# Altium PCB CS301_YOURGROUPNUM.PcbDoc
Units mil, origin at the board's own origin, x right, y up, seen from the top; angles counter-clockwise.
Board outline 4560 x 5000 mil, 2 copper layers (Top Layer, Bottom Layer); 100 components, 58 nets, 323 pads, 8 vias.
Unrouted connection lines stored in the file: 100.
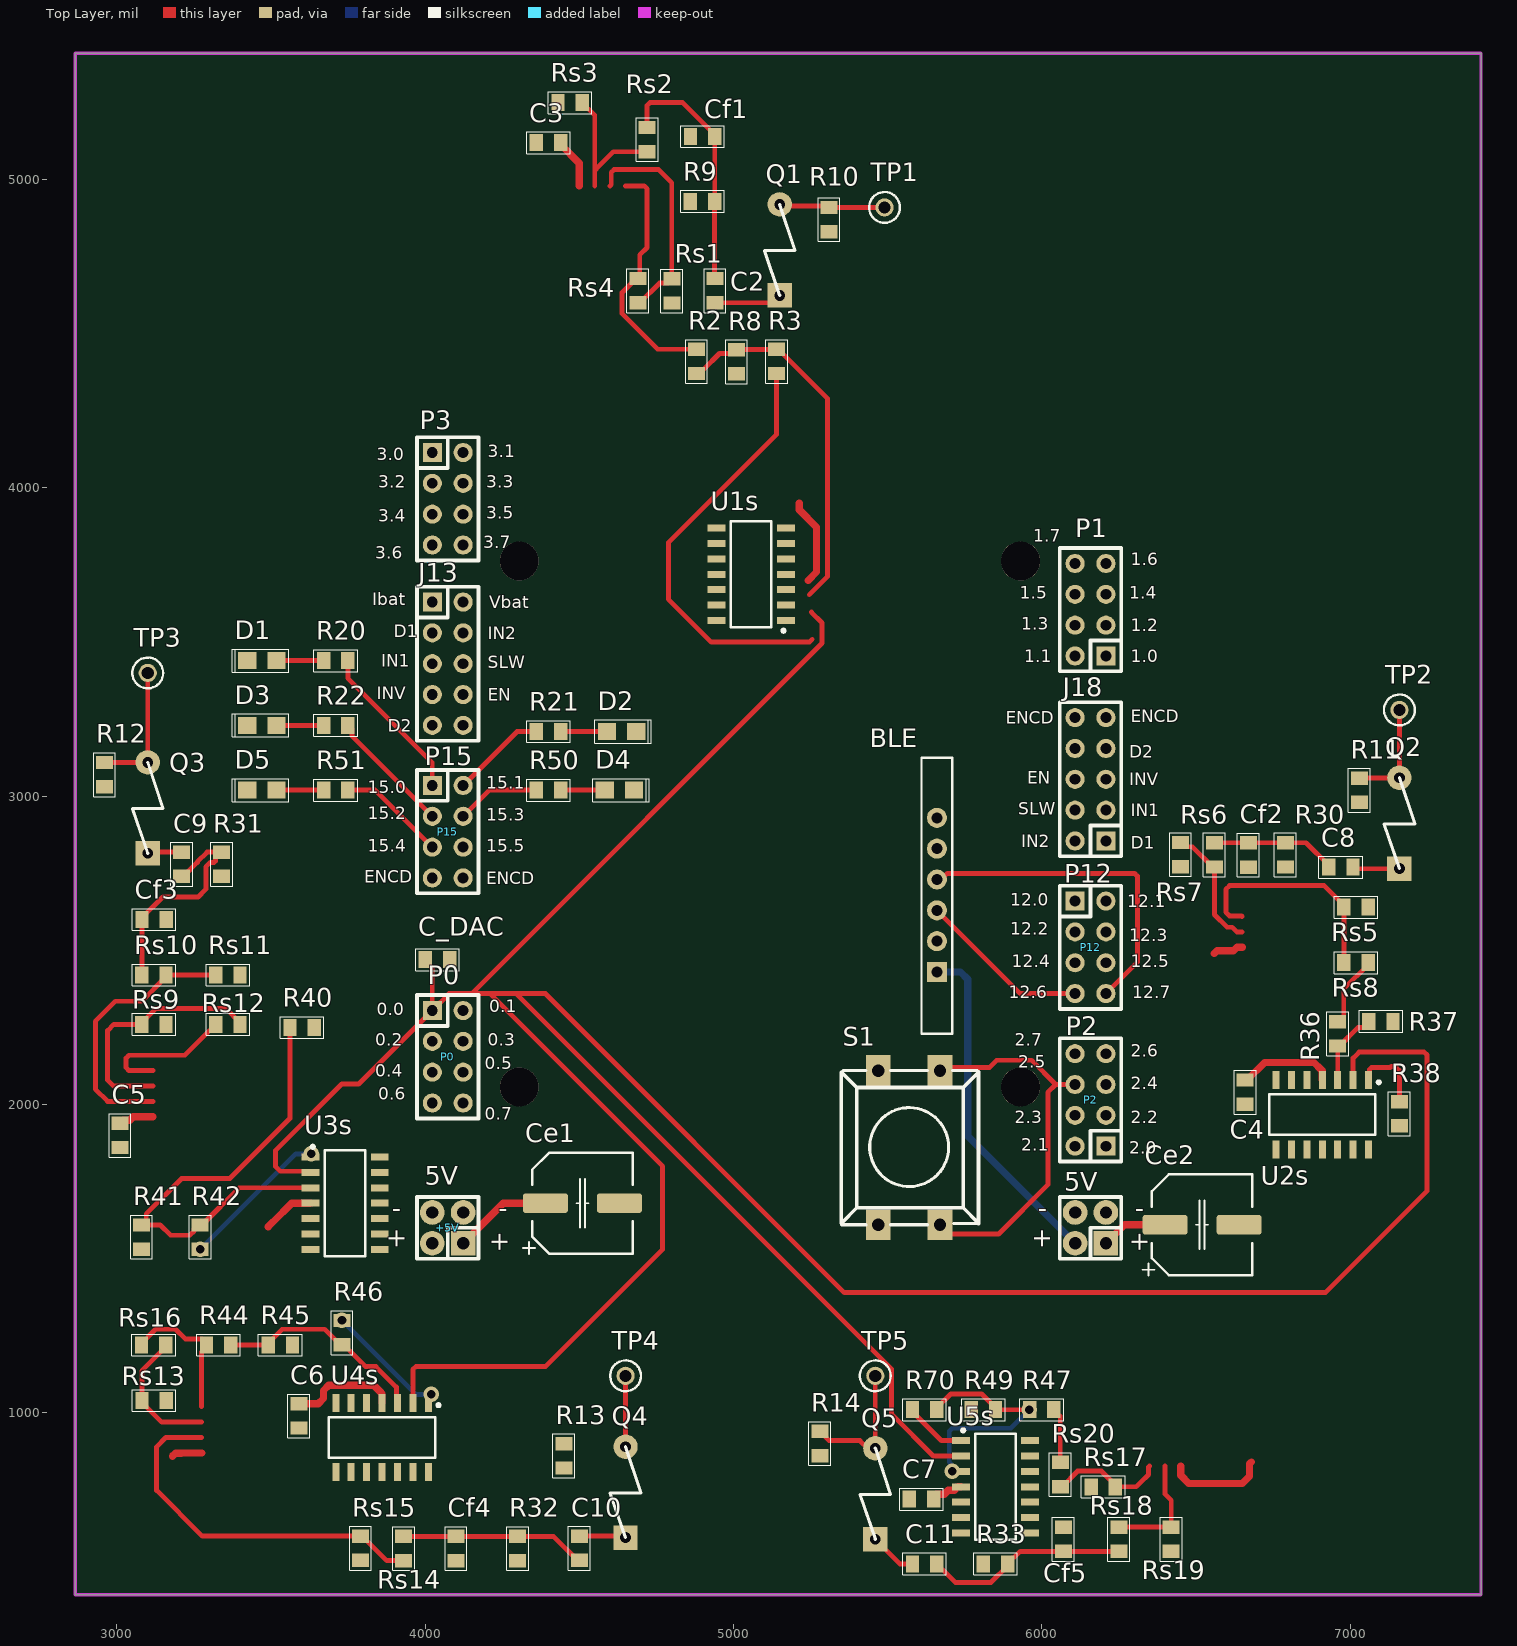
[diagram p0: Top Layer view]
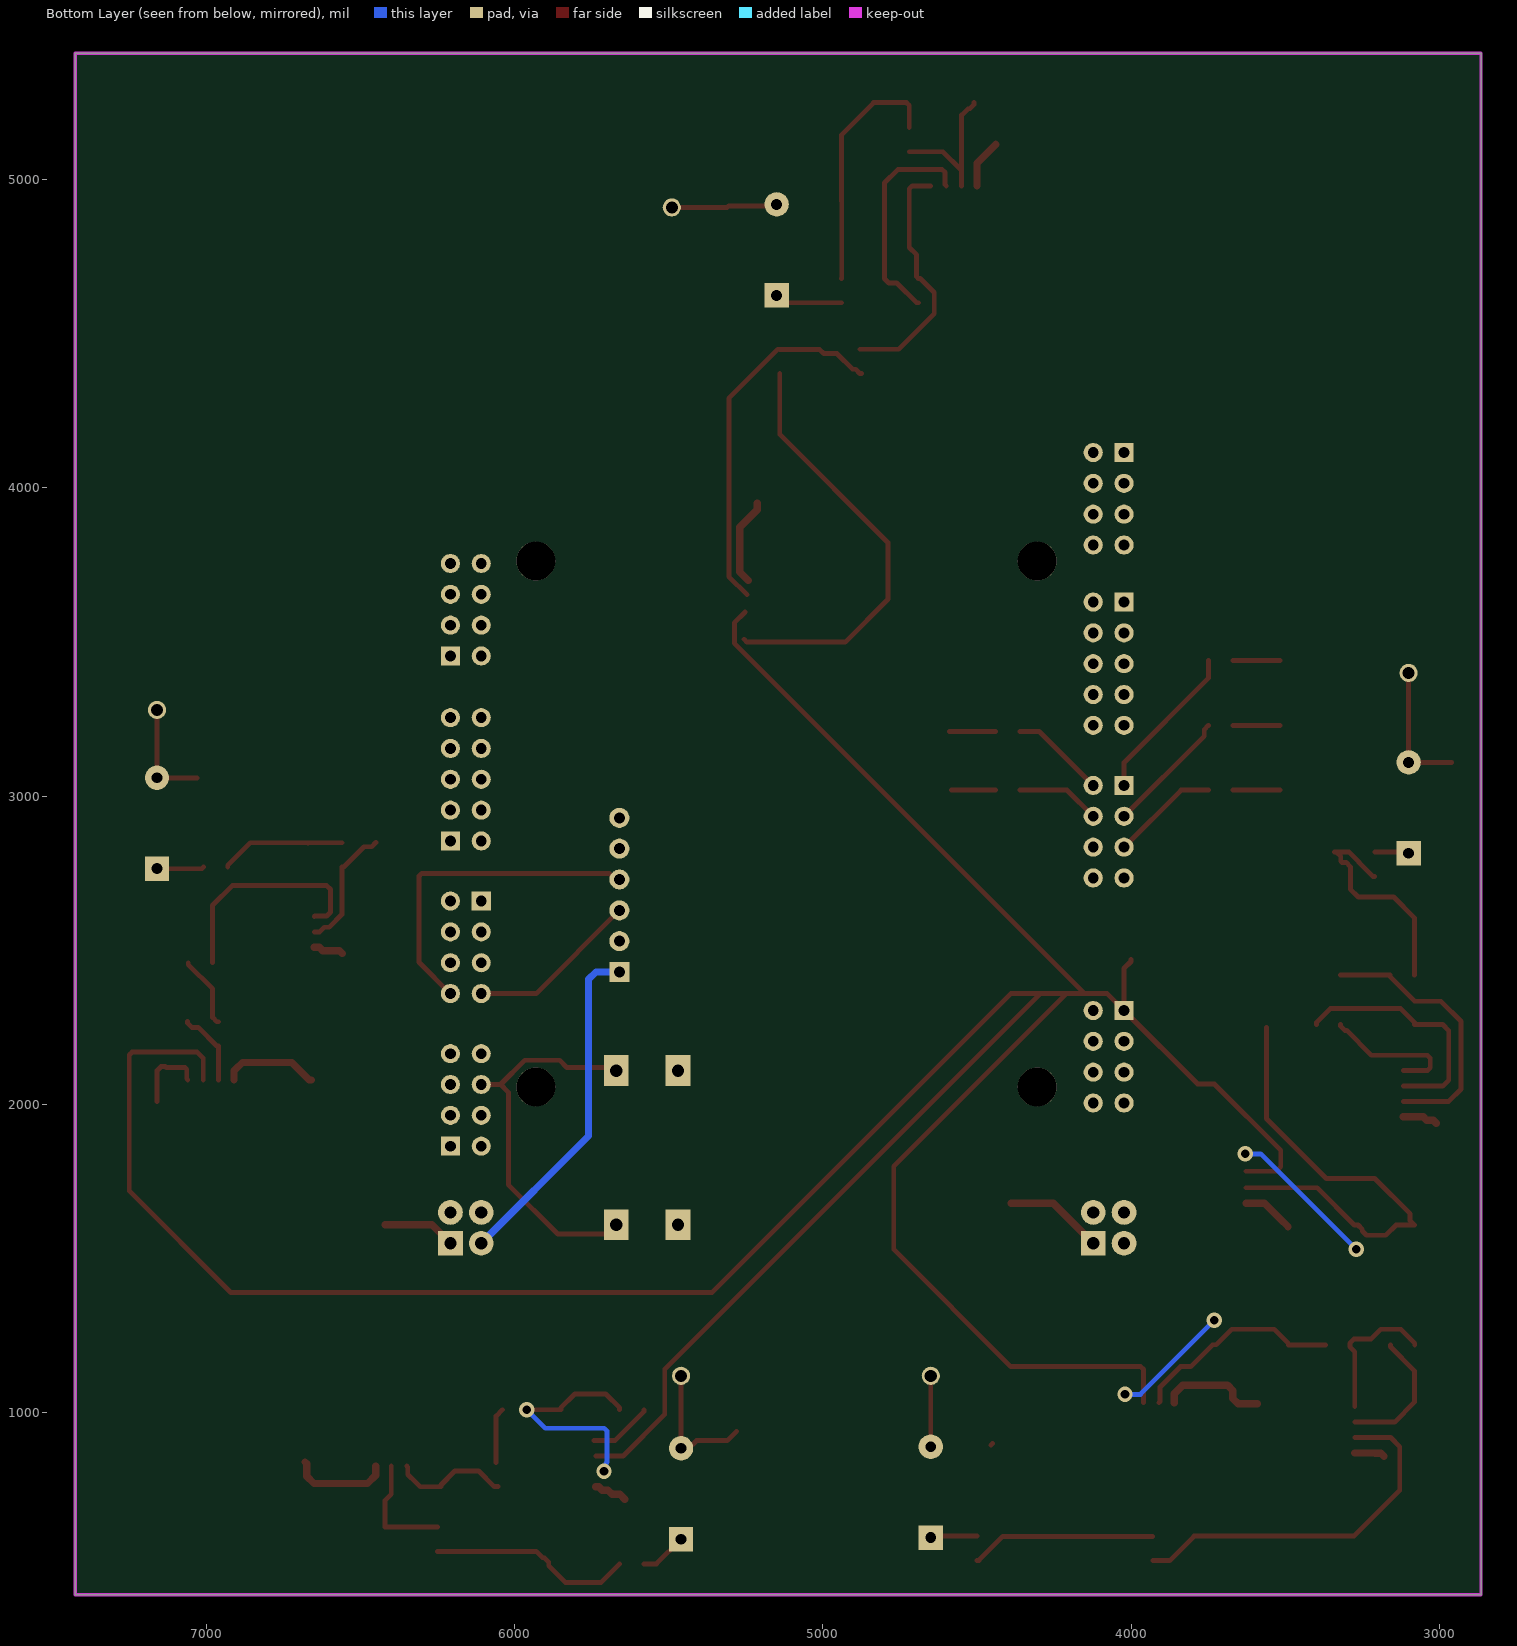
[diagram p1: Bottom Layer view, seen from below]

## Layer stack, top to bottom
Top Solder: solder mask 0.4, Solder Resist, Dk 3.5
Top Layer: signal copper 1.4
Dielectric 1: dielectric 12.6, FR-4, Dk 4.8
Bottom Layer: signal copper 1.4
Bottom Solder: solder mask 0.4, Solder Resist, Dk 3.5

## Board outline
2865,410 2865,5410 7425,5410 7425,410

## Design rules (kind name [scope] priority, off if disabled: settings)
Clearance [All] p1: gap=15.75 ignorepadtopadclearanceinfootprint=FALSE
Height [All] p1: minheight=0 maxheight=787.4 prefheight=500
HoleSize [All] p1: absolutevalues=TRUE maxlimit=393.7 minlimit=15.75 maxpercent=80.000 minpercent=20.000
PolygonConnect [All] p1: connectstyle=Relief reliefconductorwidth=23.62 reliefentries=4 polygonreliefangle="90 Angle" airgapwidth=15.75
RoutingVias [All] p1: holewidth=28 width=50 viastyle="Through Hole" minholewidth=28 minwidth=50 maxholewidth=28 maxwidth=50
SilkToSilkClearance [All] p1: silktosilkclearance=3.94
SilkToSolderMaskClearance [IsPad] p1: minsilkscreentomaskgap=3.94 clearancetoexposedcopper=TRUE
SolderMaskExpansion [All] p1: expansion=0 istentingtop=FALSE
SupplyNets "Schematic Supply Nets_9" [InNet('Vref_DAC')] p1: voltage=0.000
SupplyNets "Schematic Supply Nets_7" [InNet('Vb5')] p2: voltage=0.000
SupplyNets "Schematic Supply Nets_6" [InNet('Vb3')] p3: voltage=0.000
SupplyNets "Schematic Supply Nets_5" [InNet('Vb2')] p4: voltage=0.000
SupplyNets "Schematic Supply Nets_3" [InNet('Vb4')] p5: voltage=0.000
SupplyNets "Schematic Supply Nets_2" [InNet('Vb1')] p6: voltage=0.000
SupplyNets "Schematic Supply Nets_35" [InNet('Vout2')] p7: voltage=0.000
SupplyNets "Schematic Supply Nets_34" [InNet('Vout1')] p8: voltage=0.000
SupplyNets "Schematic Supply Nets_33" [InNet('Va5')] p9: voltage=0.000
SupplyNets "Schematic Supply Nets_32" [InNet('Vd5')] p10: voltage=0.000
SupplyNets "Schematic Supply Nets_30" [InNet('Vout3')] p11: voltage=0.000
SupplyNets "Schematic Supply Nets_28" [InNet('Vd2')] p12: voltage=0.000
SupplyNets "Schematic Supply Nets_27" [InNet('Vd1')] p13: voltage=0.000
SupplyNets "Schematic Supply Nets_25" [InNet('Va3')] p14: voltage=0.000
SupplyNets "Schematic Supply Nets_23" [InNet('Va2')] p15: voltage=0.000
SupplyNets "Schematic Supply Nets_22" [InNet('VRX')] p16: voltage=0.000
SupplyNets "Schematic Supply Nets_21" [InNet('Va1')] p17: voltage=0.000
SupplyNets "Schematic Supply Nets_20" [InNet('Vout5')] p18: voltage=0.000
SupplyNets "Schematic Supply Nets_19" [InNet('Va4')] p19: voltage=0.000
SupplyNets "Schematic Supply Nets_18" [InNet('Vd4')] p20: voltage=0.000
SupplyNets "Schematic Supply Nets_14" [InNet('VTX')] p21: voltage=0.000
SupplyNets "Schematic Supply Nets_13" [InNet('Vd3')] p22: voltage=0.000
SupplyNets "Schematic Supply Nets_10" [InNet('Vout4')] p23: voltage=0.000
SupplyNets "Schematic Supply Nets_8" [InNet('+5V')] p24: voltage=0.000
SupplyNets "Schematic Supply Nets_4" [InNet('GND')] p25: voltage=0.000
SupplyNets "Schematic Supply Nets_1" [InNet('5V')] p26: voltage=0.000
SupplyNets "Schematic Supply Nets" [InNet('+5')] p27: voltage=0.000
Width [All] p1: maxlimit=393.7 minlimit=15.75 preferedwidth=23.62
26 further rules are at their usual default settings.

## Components (designator, comment, footprint, x,y, rotation, side; value= is the part's Value field where it differs from the comment)
5V "5V" IDC4 6208.11,1550 r90 top locked
+5V "5V" IDC4 4123.11,1550 r90 top locked
BLE "BLE Module Header" HM10_HDR1X6 5660,2430 r90 top
C2 "0.27u" "0805 CAP" 4940,4640 r90 top
C3 "100nF" "0805 CAP" 4400,5120 r180 top
C4 "100nF" "0805 CAP" 6660,2040 r270 top
C5 "100nF" "0805 CAP" 3010,1900 r270 top
C6 "100nF" "0805 CAP" 3590,990 r270 top
C7 "100nF" "0805 CAP" 5610,720 r180 top
C8 "0.27u" "0805 CAP" 6970,2770 r180 top
C9 "0.27u" "0805 CAP" 3210,2779.37 r270 top
C10 "0.27u" "0805 CAP" 4500,560.63 r270 top
C11 "0.27u" "0805 CAP" 5620,510 r0 top
C_DAC "0.1uF" "0805 CAP" 4040,2470 r0 top
Ce1 "100uF" "CAP POL 8x5.4mm SMT" 4510.08,1680 r0 top
Ce2 "100uF" "CAP POL 8x5.4mm SMT" 6520,1610 r0 top
Cf1 "*" "0805 CAP" 4900,5140 r180 top
Cf2 "*" "0805 CAP" 6670,2809.37 r270 top
Cf3 "*" "0805 CAP" 3120.63,2600 r0 top
Cf4 "*" "0805 CAP" 4100,560 r270 top
Cf5 "*" "0805 CAP" 6070,590 r90 top
D1 "LTST-C170KGKT" "0805 LED" 3470,3440 r180 top
D2 "LTST-C170KGKT" "0805 LED" 4637.24,3210 r0 top
D3 "LTST-C170KGKT" "0805 LED" 3470,3230 r180 top
D4 "LTST-C170KGKT" "0805 LED" 4630,3020 r0 top
D5 "LTST-C170KGKT" "0805 LED" 3470,3020 r180 top
J13 "CON10" IDC10 4023.11,3630 r270 top locked
J18 "CON10" IDC10 6208.11,2855 r90 top locked
P0 "P0" idc8 4023.11,2305 r270 top locked
P1 "P1" idc8 6208.11,3455 r90 top locked
P2 "P2" idc8 6208.11,1865 r90 top locked
P3 "P3" idc8 4023.11,4115 r270 top locked
P12 "P12" idc8 6108.11,2660 r270 top locked
P15 "P15" IDC8 4023.11,3035 r270 top locked
Q1 "VEMT3700" VEMT3700 5300,4525 r90 top
Q2 "VEMT3700" VEMT3700 7310,2665 r90 top
Q3 "VEMT3700" VEMT3700 3250,2715 r90 top
Q4 "VEMT3700" VEMT3700 4800,495 r90 top
Q5 "VEMT3700" VEMT3700 5610,490 r90 top
R2 "2k" "0805 RES" 4880,4410.63 r270 top
R3 "50k" "0805 RES" 5140,4410.63 r90 top
R8 "40k" "0805 RES" 5010,4409.37 r270 top
R9 "100k" "0805 RES" 4899.37,4930 r0 top
R10 "33k" "0805 RES" 5310,4870.63 r90 top
R11 "33k" "0805 RES" 7030,3019.37 r90 top
R12 "33k" "0805 RES" 2960,3070 r90 top
R13 "33k" "0805 RES" 4450,860.63 r90 top
R14 "33k" "0805 RES" 5280,900.63 r90 top
R20 "68" "0805 RES" 3710,3440 r180 top
R21 "68" "0805 RES" 4400,3210 r0 top
R22 "68" "0805 RES" 3710,3230 r180 top
R30 "100k" "0805 RES" 6790,2810 r90 top
R31 "100k" "0805 RES" 3340,2779.37 r90 top
R32 "100k" "0805 RES" 4300,560 r90 top
R33 "100k" "0805 RES" 5850,510 r0 top
R36 "2k" "0805 RES" 6960,2229.37 r270 top
R37 "40k" "0805 RES" 7100,2270 r0 top
R38 "50k" "0805 RES" 7160,1970 r270 top
R40 "2k" "0805 RES" 3600.63,2250 r180 top
R41 "40k" "0805 RES" 3080,1570 r270 top
R42 "50k" "0805 RES" 3270,1570 r90 top
R44 "2k" "0805 RES" 3330,1220 r0 top
R45 "40k" "0805 RES" 3530,1220 r0 top
R46 "50k" "0805 RES" 3730,1260 r270 top
R47 "2k" "0805 RES" 6000,1010 r180 top
R49 "40k" "0805 RES" 5810.63,1010 r180 top
R50 "68" "0805 RES" 4400,3020 r0 top
R51 "68" "0805 RES" 3710,3020 r180 top
R70 "50k" "0805 RES" 5620,1010 r0 top
Rs1 "10k" "0805 RES" 4800,4639.37 r90 top
Rs2 "10k" "0805 RES" 4720,5130 r270 top
Rs3 "36k" "0805 RES" 4470,5250 r0 top
Rs4 "36k" "0805 RES" 4690,4640 r90 top
Rs5 "10k" "0805 RES" 7019.37,2640 r180 top
Rs6 "10k" "0805 RES" 6560,2810 r270 top
Rs7 "36k" "0805 RES" 6450,2810.63 r90 top
Rs8 "36k" "0805 RES" 7019.37,2460 r0 top
Rs9 "10k" "0805 RES" 3120,2260 r180 top
Rs10 "10k" "0805 RES" 3120,2420 r0 top
Rs11 "36k" "0805 RES" 3360,2420 r180 top
Rs12 "36k" "0805 RES" 3360,2260 r180 top
Rs13 "10k" "0805 RES" 3120.63,1040 r180 top
Rs14 "10k" "0805 RES" 3930,560 r270 top
Rs15 "36k" "0805 RES" 3790,560.63 r90 top
Rs16 "36k" "0805 RES" 3119.37,1220 r180 top
Rs17 "10k" "0805 RES" 6199.37,760 r0 top
Rs18 "10k" "0805 RES" 6250,590 r90 top
Rs19 "36k" "0805 RES" 6420,590 r90 top
Rs20 "36k" "0805 RES" 6060,800 r90 top
S1 "SW-PB" SW-PB 5450,1710 r90 top
TP1 "5003" TP_TH 5490,4910 r0 top
TP2 "5003" TP_TH 7160,3280 r0 top
TP3 "5003" TP_TH 3100,3400 r0 top
TP4 "5003" TP_TH 4650,1120 r0 top
TP5 "5003" TP_TH 5460,1120 r0 top
U1s "LM324DR2G" SOIC-14 5057.4,3720 r180 top
U2s "LM324DR2G" SOIC-14 6910,1967.4 r270 top
U3s "LM324DR2G" SOIC-14 3740,1680 r0 top
U4s "LM324DR2G" SOIC-14 3860,920 r270 top
U5s "LM324DR2G" SOIC-14 5850,760 r0 top

## Footprints (in the part's own frame and the unit in brackets; to place one, negate y for a bottom-side part, rotate by r counter-clockwise, add the part's x,y. Pads: shape width x height; smd on the part's side, far side on the other; paste and mask are expansions set on the pad)
"0805 CAP" [mm] "http://www.digikey.co.nz/Web%20Export/Supplier%20Content/Vishay_8026/PDF/VishayBeyschlag_SolderPad.pdf?redirected=1 with dimension G modified by +0.25mm"
  rect 1.1x1.4 smd: 1(-1,0) 2(1,0)
  silkscreen extent -1.8,-0.9 1.8,0.9, body extent -1.04,-0.66 1.04,0.66, height 0.61
"0805 LED" [mm] "RED AS AlGaAs SMD LED, Body; 2mm x 1.25 mm (LxW)"
  rect 1.5x1.4 smd: 1(-1.2,0) 2(1.2,0)
  silkscreen extent -2.2,-0.95 2.45,0.95, body extent -1,-0.63 1,0.63, height 1.1
"0805 RES" [mm] "http://www.digikey.co.nz/Web%20Export/Supplier%20Content/Vishay_8026/PDF/VishayBeyschlag_SolderPad.pdf?redirected=1 with dimension G modified by +0.25mm"
  rect 1.1x1.4 smd: 1(-1,0) 2(1,0)
  silkscreen extent -1.8,-0.9 1.8,0.9, body extent -1.04,-0.66 1.04,0.66, height 0.61
"CAP POL 8x5.4mm SMT" [mm]
  round 0.508 on Mech15: 0(0,0)
  rrect25% 3.7x1.6 smd: 1(-3.05,0) 2(3.05,0)
  silkscreen extent -4.9,-4.2 4.15,4.15, body extent -4.5,-4.15 4.5,4.15, height 5.4
HM10_HDR1X6 [mil] "Connector; Header; 6 Position"
  rect 65x65 hole 35.43: 1(0,0)
  round 65 hole 35.43: 2(100,0) 3(200,0) 4(300,0) 5(400,0) 6(500,0)
  silkscreen extent -200,-50 695,50, body extent -142,-39 571,228, height 1843
IDC4 [mil]
  rect 80x80 hole 40: 1(0,0)
  round 80 hole 40: 2(0,100) 3(100,0) 4(100,100)
  silkscreen extent -50,-50 150,150
idc8 [mil]
  rect 62x62 hole 35: 1(0,0)
  round 62 hole 35: 2(0,100) 3(100,0) 4(100,100) 5(200,0) 6(200,100) 7(300,0) 8(300,100)
  silkscreen extent -50,-50 350,150
IDC8 [mil]
  rect 62x62 hole 35: 1(0,0)
  round 62 hole 35: 2(0,100) 3(100,0) 4(100,100) 5(200,0) 6(200,100) 7(300,0) 8(300,100)
  silkscreen extent -50,-50 350,150
IDC10 [mil]
  rect 62x62 hole 35: 1(0,0)
  round 62 hole 35: 2(0,100) 3(100,0) 4(100,100) 5(200,0) 6(200,100) 7(300,0) 8(300,100) 9(400,0) 10(400,100)
  silkscreen extent -50,-50 450,150
SOIC-14 [mm] "SOIC, 14-Leads, Body 8.75x4mm, Pitch 1.27mm"
  rect 1.48x0.58 smd: 1(-2.86,3.81) 2(-2.86,2.54) 3(-2.86,1.27) 4(-2.86,0) 5(-2.86,-1.27) 6(-2.86,-2.54) 7(-2.86,-3.81) 8(2.86,-3.81) 9(2.86,-2.54) 10(2.86,-1.27) 11(2.86,0) 12(2.86,1.27) 13(2.86,2.54) 14(2.86,3.81)
  silkscreen extent -2.79,-4.38 1.67,4.77, body extent -3.1,-4.38 3.1,4.37, height 1.75
SW-PB [mil]
  rect 100x80 hole 40: 1(-100,-20) 1(400,-20) 2(-100,-220) 2(400,-220)
  silkscreen extent -100,-345 400,100
TP_TH [mm] "Test Point, Through Hole, Dia 2.54mm"
  round 1.5 hole 1: 1(0,0)
  silkscreen extent -1.27,-1.27 1.27,1.27, body extent -1.27,-1.27 1.27,1.27, height 4.57
VEMT3700 [mm]
  rect 2x2 hole 0.9: 1(2.54,3.81)
  round 2 hole 0.9: 2(10.033,3.81)
  silkscreen extent 2.54,2.54 10.03,5.08

## Part data
5V +5V: library part CON4, "Connector"
BLE: library part BLEModule_TH, "2.54mm pitch 6-pin header for BLE module", LatestRevisionDate=17-Jul-2002, LatestRevisionNote="Re-released for DXP Platform.", Publisher="Altium Limited"
C2 C3 C4 C5 C6 C7 C8 C9 C10 C11 C_DAC Cf1 Cf2 Cf3 Cf4 Cf5: library part CerCap_SMT_0805, "SMT ceramic capacitor 0805 size"
Ce1 Ce2: library part ElecCap_SMT_8D0, "CAP ALUM 22UF 20% 50V SMD (Model: UWX1H220MCL1GB)", Capacitance 1="22 µF", ESR (Equivalent Series Resistance)=-, Lifetime @ Temp.="2000 Hrs @ 85°C", Manufacturer=Nichicon, Manufacturer Part Number=UWX1V220MCL1GB, Operating Temperature="-40°C ~ 85°C", Package / Case="Radial, Can - SMD", Supplier Part Number 1=493-2136-1-ND, Tolerance=±20%, Applications="General Purpose", Category=Capacitors, ComponentLink1Description=http://nichicon-us.com/english/products/pdfs/e-uwx.pdf, ComponentLink1URL=http://nichicon-us.com/english/products/pdfs/e-uwx.pdf, Height - Seated (Max)="0.213\" (5.40mm)", Lead Spacing=-, Mounting Type="Surface Mount", Packaging="Cut Tape (CT)", Part Status=Active, Polarization=Polar, Pricing 1="1=0.59, 10=0.406, 100=0.2304, 500=0.16268 (NZD)", Ratings=-, Revision="July-2002: Re-released for DXP Platform.", RoHS="RoHS Compliant", Size / Dimension="0.248\" Dia (6.30mm)", Stock 1=680, Supplier 1=Digi-Key, Surface Mount Land Size="0.260\" L x 0.260\" W (6.60mm x 6.60mm)"
D1 D2 D3 D4 D5: library part LED_SMT_0805, "SMT LED 0805 size", Color=Green, Current - Test=20mA, Lens Color=Colorless, Manufacturer="Lite-On Inc.", Millicandela Rating=35mcd, Package / Case="0805 (2012 Metric)", Supplier Part Number 1=160-1414-1-ND, Voltage - Forward (Vf) (Typ)=2V, Category=Optoelectronics, ComponentLink1Description=http://optoelectronics.liteon.com/upload/download/DS22-2000-073/LTST-C170KGKT.pdf, ComponentLink1URL=http://optoelectronics.liteon.com/upload/download/DS22-2000-073/LTST-C170KGKT.pdf, Features=-, Height (Max)=1.10mm, Lens Style/Size="Rectangle with Flat Top, 1.40mm x 1.25mm", Lens Transparency=Clear, Manufacturer Part Number=LTST-C170KGKT, Mounting Type="Surface Mount", Packaging="Cut Tape (CT)", Part Status=Active, Pricing 1="1=0.62, 10=0.459, 25=0.338, 100=0.2415, 250=0.16416, 500=0.14486, 1000=0.11347 (NZD)", RoHS="RoHS Compliant", Size / Dimension="2.00mm L x 1.25mm W", Stock 1=503069, Supplier 1=Digi-Key, Viewing Angle=130°, Wavelength - Dominant=571nm, Wavelength - Peak=574nm
J13 J18: "Connector"
P0 P1 P2 P3: library part CON8, "Connector"
P12 P15: library part CON8_1, "Connector"
Q1 Q2 Q3 Q4 Q5: "Silicon NPN Phototransistor"
R2 R3 R8 R9 R10 R11 R12 R13 R14 R20 R21 R22 R30 R31 R32 R33 R36 R37 R38 R40 R41 R42 R44 R45 R46 R47 R49 R50 R51 R70 Rs1 Rs2 Rs3 Rs4 Rs5 Rs6 Rs7 Rs8 Rs9 Rs10 Rs11 Rs12 Rs13 Rs14 Rs15 Rs16 Rs17 Rs18 Rs19 Rs20: library part Res_SMT_0805, "0805 resistor", ComponentLink1Description=https://nz.mouser.com/datasheet/2/315/AOA0000C304-1149620.pdf, LatestRevisionDate=17-Jul-2002, LatestRevisionNote="Re-released for DXP Platform.", PackageReference=AXIAL-0.4, Published=8-Jun-2000, Publisher="Altium Limited"
S1: "Push Button Switch"
TP1 TP2 TP3 TP4 TP5: library part TestPoint, "Test Point, Orange, 1-Pin THD, RoHS", Forward Current="3 A", Forward Voltage="1.08 V", Max Operating Temperature="150 degC", Max Surge Current="80 A", Min Operating Temperature="-65 degC", Package Quantity=500, Peak Reverse Current="600 uA", ComponentLink1Description="Manufacturer URL", ComponentLink1URL=http://www.keyelco.com/, ComponentLink2Description=Datasheet, ComponentLink2URL=http://keyelco.com/userAssets/file/M65p56.pdf, DatasheetVersion=Jun-15, Diameter="5.3 mm", Height="0.25 inch", Length="9.5 mm", Mount="Through Hole", PackageDescription="1-Pin Through Hole Device, Dia 2.54 mm", PackageReference=5003, Packaging=Bulk, Pins=2, Radiation Hardening=No, REACH SVHC="No SVHC", RoHSCompliant=true, Weight="0.01 lb", Width="0.25 inch"
U1s U2s U3s U4s U5s: library part LM324DR_SMT_SOIC16, "Single Supply Quad Operational Amplifier, 3 to 32 V, 0 to 70 degC, 14-Pin SOIC, Pb-Free, Tape and Reel", Manufacturer="On Semiconductor", ComponentLink1Description="Manufacturer URL", ComponentLink1URL=http://www.onsemi.com/, ComponentLink2Description=Datasheet, ComponentLink2URL=http://www.onsemi.cn/pub_link/Collateral/LM324-D.PDF, ComponentLink3Description="Package Specification", ComponentLink3URL=http://www.onsemi.com/pub_link/Collateral/751A-03.PDF, DatasheetVersion="Rev. 25", Mounting Technology="Surface Mount", PackageDescription="14-Pin Small Outline Integrated Circuit, Body 8.65 x 3.9 mm, Pitch 1.27 mm", PackageReference=SOIC-14-751A-03, PackageVersion="Rev. K, 05/2011", Packing="Tape and Reel", PartNumber=LM324DR2G, RoHS=TRUE, VCC Max (V)=32, VCC Min (V)=3

## Free pads (board coordinates)
  round 125.98 hole 125.98 unplated: 1(4305.11,2057) 1(4305.11,3763) 1(5931.11,2057) 1(5931.11,3763)

## Via types
v1: diameter 50, hole 28, Top Layer to Bottom Layer, 8 vias

## Nets (pads, with @x,y where several pads share a name; then routed paths per layer and width w, separated by ;. In a path a pad name is that pad's centre, name@x,y a point inside that pad or via, vN(x,y) a via of type N, cw(c..) or ccw(c..) an arc to the next point about the centre after c; other vN are vias at no path point)
5V: C3.1 C4.1 C5.1 C6.1 C7.1 U1s.4 U2s.4 U3s.4 U4s.4 U5s.4 | length 1226.3
  Top Layer w15.75: C3.1@4439.37,5114.09 C3.1
  Top Layer w23.62: C5.1 3019.84,1949.21 3042.05,1949.21 3052.83,1960 3117.4,1960 ; 3490.99,1603.59 3490.99,1604.46 3505.75,1619.21 3506.61,1619.21 3567.4,1680 U3s.4 ; C6.1 3652.99,1029.37 3670.08,1046.46 3670.08,1072.2 3687.17,1089.29 3832.83,1089.29 3855.76,1066.37 3860,1062.12 U4s.4 ; C3.1@4439.37,5114.09 4500,5053.46 4500,4980 ; C7.1@5642.46,720 5658.21,735.75 5683.62,735.75 5696.85,748.98 5715.75,748.98 5726.77,760 U5s.4 ; C4.1 6665.91,2079.37 6723.23,2136.69 6882.83,2136.69 6904.99,2114.53 6910,2109.53 U2s.4
+5: +5V.1 +5V.2 Ce1.1 | length 320.7
  Top Layer w23.62: +5V.1 4253.11,1680 Ce1.1
+5V: 5V.1 5V.2 BLE.1 Ce2.1 | length 1362.7
  Top Layer w23.62: 5V.2@6092.85,1550 v1(6108.11,1550) ; 5V.1 6268.11,1610 Ce2.1@6420.49,1610
  Bottom Layer w23.62: v1(5660,2430) 5736.16,2430 5760,2406.16 5760,1898.11 v1(6108.11,1550)
GND: 5V.3 5V.4 +5V.3 +5V.4 BLE.2 C3.2 C4.2 C5.2 C6.2 C7.2 C_DAC.2 Ce1.2 Ce2.2 Cf1.2 Cf2.2 Cf3.2 Cf4.2 Cf5.2 D1.2 D2.2 D3.2 D4.2 D5.2 R8.2 R9.1 R10.1 R11.1 R12.1 R13.1 R14.1 R30.1 R31.1 R32.1 R33.1 R37.2 R41.2 R45.2 R49.2 Rs1.1 Rs3.1 Rs5.1 Rs7.1 Rs9.1 Rs11.1 Rs13.1 Rs15.1 Rs17.1 Rs19.1 S1.1 U1s.11 U2s.11 U3s.11 U4s.11 U5s.11
NetD1_1: D1.1 R20.2 | length 153.4
  Top Layer w15.75: D1.1 R20.2
NetD2_1: D2.1 R21.2 | length 150.6
  Top Layer w15.75: R21.2 D2.1
NetD3_1: D3.1 R22.2 | length 153.4
  Top Layer w15.75: D3.1 R22.2
NetD4_1: D4.1 R50.2 | length 143.4
  Top Layer w15.75: R50.2 D4.1
NetD5_1: D5.1 R51.2 | length 153.4
  Top Layer w15.75: D5.1 R51.2
NetP2_6: P2.6 S1.2 | length 1249.3
  Top Layer w15.75: S1.2@5670,1610 5700,1580 5860,1580 6020,1740 6020,2040 6045,2065 6045.6,2065 ; S1.2@5670,2110 5680,2120 5830,2120 5853.61,2143.61 5966.99,2143.61 6045.6,2065 ; P2.6 6045.6,2065
NetP15_1: P15.1 R20.1 | length 518.4
  Top Layer w15.75: R20.1 3749.37,3382.98 4023.11,3109.24 P15.1
NetP15_2: P15.2 R21.1 | length 310
  Top Layer w15.75: P15.2 4298.11,3210 R21.1
NetP15_3: P15.3 R22.1 | length 408.4
  Top Layer w15.75: R22.1 3763.15,3216.22 3763.15,3194.96 P15.3
NetP15_4: P15.4 R50.1 | length 272.7
  Top Layer w15.75: P15.4 4208.11,3020 R50.1
NetP15_5: P15.5 R51.1 | length 350.4
  Top Layer w15.75: R51.1 3838.11,3020 P15.5
NetQ1_2: Q1.2 R10.2 TP1.1 | length 344.1
  Top Layer w15.75: Q1.2 5155,4915 5305,4915 R10.2 TP1.1
NetQ2_2: Q2.2 R11.2 TP2.1 | length 350.5
  Top Layer w15.75: R11.2 7030.63,3059.37 7159.37,3059.37 Q2.2 TP2.1
NetQ3_2: Q3.2 R12.2 TP3.1 | length 430.3
  Top Layer w15.75: R12.2 2960.31,3109.68 3099.68,3109.68 Q3.2 TP3.1
NetQ4_2: Q4.2 R13.2 TP4.1 | length 244.1
  Top Layer w15.75: R13.2 R13.2@4455,895 ; Q4.2@4645,895 Q4.2 TP4.1
NetQ5_2: Q5.2 R14.2 TP5.1 | length 437.8
  Top Layer w15.75: R14.2 5310,910 5410,910 5422.95,897.05 5447.95,897.05 Q5.2 TP5.1
NetR2_2: R2.2 R3.2 R8.1 U1s.5 | length 1190.2
  Top Layer w15.75: R2.2@4874.09,4371.26 R2.2 4893.78,4385.04 4903.51,4385.04 4954.57,4436.09 4997.35,4436.09 R8.1 ; R8.1@5010.63,4449.37 5139.37,4449.37 R3.2 5145.91,4450 5304.72,4291.18 5304.72,3712.49 5245.78,3653.54
NetR36_2: R36.2 R37.1 R38.2 U2s.5 | length 247.2
  Top Layer w15.75: 6960,2080 R36.2 6965.91,2190 7026.22,2250.31 7046.85,2250.31 7060.63,2264.09 R37.1
NetR40_2: R40.2 R41.1 R42.2 U3s.5 | length 1559.6
  Top Layer w15.75: R41.1 R41.1@3081.47,1609.37 ; R40.2 3561.26,1954.7 3366.56,1760 3210,1760 3095.25,1645.25 3095.25,1623.15 R41.1@3081.47,1609.37 ; 3627.4,1730 3396.54,1730 3275.91,1609.37 R42.2 3264.09,1609.37 3250.31,1595.59 3250.31,1589.68 3236.54,1575.91 3174.09,1575.91 3140.63,1609.37 R41.1@3081.47,1609.37
NetR44_2: R44.2 R45.1 R46.2 U4s.5 | length 691.9
  Top Layer w15.75: R44.2 R45.1 3490.63,1225.91 3535.91,1271.18 3673.54,1271.18 3724.09,1220.63 R46.2 3735.91,1220.63 3806.54,1150 3840,1150 3906.46,1083.54 3906.46,1036.14 3910,1032.6
NetR47_2: R47.2 R49.1 R70.2 U5s.5 | length 780.1
  Top Layer w15.75: R70.2 5659.37,1015.91 5704.65,1061.18 5804.72,1061.18 5850,1015.91 R49.1 R47.2 R47.2@5960.63,1015.91
  Bottom Layer w15.75: v1(5710,810) 5703.45,816.55 5703.45,836.55 5700,840 5700,940.77 5709.23,950 5900,950 v1(5960,1010)
NetRs1_2: Rs1.2 Rs4.1 U1s.2 | length 716.6
  Top Layer w15.75: 4600,4980 4603.54,4983.54 4603.54,5023.53 4612.77,5032.76 4757.24,5032.76 4800,4990 Rs1.2 4786.22,4664.96 4760.24,4664.96 4695.91,4600.63 Rs4.1
NetRs2_2: Rs2.2 Rs3.2 U1s.3 | length 480.4
  Top Layer w15.75: Rs3.2 4509.37,5244.09 4523.15,5230.31 4529.06,5230.31 4550,5209.37 4550,5033.54 4550,4980 ; 4553.54,5033.54 4610.63,5090.63 Rs2.2
NetRs5_2: Rs5.2 Rs8.1 U2s.2 | length 732.9
  Top Layer w15.75: 6650,2610 6648.31,2611.69 6609.23,2611.69 6597.24,2623.67 6597.24,2698.02 6609.23,2710 6915.91,2710 6980,2645.91 Rs5.2 Rs8.1
NetRs6_2: Rs6.2 Rs7.2 U2s.3 | length 410.5
  Top Layer w15.75: Rs7.2 6463.78,2836.22 6488.5,2836.22 6554.09,2770.63 Rs6.2 6560,2616.37 6601.41,2574.96 6617.32,2574.96 6632.28,2560 6650,2560
NetRs9_2: Rs9.2 Rs12.1 U3s.2 | length 797.2
  Top Layer w15.75: Rs9.2 2990,2260 2970,2240 2970,2079.22 2989.22,2060 3117.4,2060 ; Rs9.2@3080.63,2265.91 3125.91,2311.18 3354.09,2311.18 3399.37,2265.91 Rs12.1
NetRs10_2: Rs10.2 Rs11.2 U3s.3 | length 880.2
  Top Layer w15.75: 3117.4,2010 2970,2010 2930,2050 2930,2270 2995.16,2335.16 3080.43,2335.16 3159.37,2414.09 Rs10.2 Rs11.2
NetRs13_2: Rs13.2 Rs16.1 U4s.2 | length 438.1
  Top Layer w15.75: Rs16.1 3158.74,1214.09 3081.26,1136.61 Rs13.2 3081.26,1034.09 3145.35,970 3274.8,970
NetRs14_2: Rs14.2 Rs15.2 U4s.3 | length 1189.6
  Top Layer w15.75: 3274.8,920 3158.64,920 3128.82,890.18 3128.82,748.56 3277.38,600 Rs15.2 ; Rs15.2@3795.91,600 3875.28,520.63 Rs14.2
NetRs17_2: Rs17.2 Rs20.1 U5s.2 | length 383.5
  Top Layer w15.75: Rs20.1@6054.09,760.63 6065.91,760.63 6116.46,811.18 6193.46,811.18 6238.74,765.91 Rs17.2 6306.24,760 6320.89,774.65 6321.2,774.65 6346.46,799.9 6346.46,823.86 6350,827.4
NetRs18_2: Rs18.2 Rs19.2 U5s.3 | length 376.3
  Top Layer w15.75: Rs18.2 Rs19.2 6420,716.42 6400,736.42 6400,827.4
Va1: C2.2 Cf1.1 R9.2 Rs2.1 | length 805
  Top Layer w15.75: Rs2.1 4720,5240.77 4729.23,5250 4835.28,5250 4939.37,5145.91 Cf1.1 4939.06,5139.69 4939.06,4930.31 R9.2 4938.74,4680.63 C2.2
Va2: C8.2 Cf2.1 R30.2 Rs6.1 | length 407.5
  Top Layer w15.75: Rs6.1 6560.31,2849.06 6669.69,2849.06 Cf2.1 6670.31,2849.06 6789.69,2849.06 R30.2 6857.17,2849.37 6930.63,2775.91 C8.2
Va3: C9.2 Cf3.1 R31.2 Rs10.1 | length 742.3
  Top Layer w15.75: Rs10.1 3080.94,2420.32 3080.94,2599.69 Cf3.1 ; Cf3.1@3081.26,2605.91 3148.67,2673.32 3263.32,2673.32 3288.82,2698.82 3288.82,2771.44 3302.66,2785.28 3315.64,2785.28 3320.31,2789.95 3320.31,2804.96 3334.09,2818.74 R31.2 3292.62,2818.74 3261.15,2787.27 3261.15,2785.25 3215.91,2740 C9.2
Va4: C10.2 Cf4.1 R32.2 Rs14.1 | length 602.4
  Top Layer w15.75: Rs14.1 Cf4.1 R32.2 4415.98,599.37 4494.09,521.26 C10.2
Va5: C11.2 Cf5.1 R33.2 Rs18.1 | length 658.2
  Top Layer w15.75: C11.2 5719.37,450 5835.28,450 5889.37,504.09 R33.2 ; R33.2@5889.37,515.91 5903.15,529.69 5909.06,529.69 5930,550.63 Cf5.1 Rs18.1
Vb1: R2.1 Rs4.2 U1s.1 | length 804.9
  Top Layer w15.75: 4650,4980 4710,4980 4720,4970 4720,4780 4695.91,4755.91 4695.91,4685.28 Rs4.2 4684.09,4679.37 4638.82,4634.09 4638.82,4565.28 4754.09,4450 4874.09,4450 R2.1
Vb2: R36.1 Rs8.2 U2s.1 | length 235.6
  Top Layer w15.75: R36.1 6965.91,2268.74 6979.69,2282.52 6979.69,2375.04 7058.74,2454.09 Rs8.2
Vb3: R40.1 Rs12.2 U3s.1 | length 462.1
  Top Layer w15.75: 3117.4,2110 3039.22,2110 3030,2119.22 3030,2150.78 3039.22,2160 3220.63,2160 3300.94,2240.31 3306.85,2240.31 3320.63,2254.09 Rs12.2
Vb4: R44.1 Rs16.2 U4s.1 | length 466.5
  Top Layer w15.75: Rs16.2 3080,1225.91 3125.28,1271.18 3190.18,1271.18 3221.67,1239.69 3276.85,1239.69 3290.63,1225.91 R44.1 3290.63,1214.09 3274.8,1198.27 3274.8,1020
Vb5: R47.1 Rs20.2 U5s.1 | length 179.2
  Top Layer w15.75: R47.1 6060,989.37 Rs20.2
Vd1: C2.1 Q1.1 | length 220.1
  Top Layer w15.75: C2.1 5125.63,4600.63 Q1.1
Vd2: C8.1 Q2.1 | length 152.7
  Top Layer w15.75: C8.1 7014.37,2765 Q2.1
Vd3: C9.1 Q3.1 | length 111.5
  Top Layer w15.75: Q3.1 3103.74,2818.74 C9.1
Vd4: C10.1 Q4.1 | length 152.1
  Top Layer w15.75: C10.1 4645,600 Q4.1
Vd5: C11.1 Q5.1 | length 153.8
  Top Layer w15.75: Q5.1 5540,510 C11.1
Vout1: P2.5 R3.1 U1s.7 | length 1405.9
  Top Layer w15.75: R3.1 5140,4173.93 4788.82,3822.75 4788.82,3639.19 4928.01,3500 5246.46,3500 5255.68,3509.22
Vout2: P2.4 R38.1 U2s.7 | length 242.2
  Top Layer w15.75: 7060,2080 7063.54,2083.54 7063.54,2114.32 7069.23,2120 7130,2120 7133.48,2123.48 7146.52,2123.48 7160,2110 R38.1
Vout3: P2.3 R42.1 U3s.7 | length 494.3
  Top Layer w15.75: R42.1 R42.1@3275.91,1530.63
  Bottom Layer w15.75: v1(3270,1530) 3580,1840 v1(3630,1840)
Vout4: P2.2 R46.1 U4s.7 | length 394.1
  Top Layer w15.75: R46.1@3726.69,1302.68 R46.1
  Bottom Layer w15.75: v1(3730,1300) 3970,1060 v1(4020,1060)
Vout5: P2.1 R70.1 U5s.7 | length 206.2
  Top Layer w15.75: R70.1 5580.63,1004.09 5674.72,910 5741.91,910
Vref_DAC: C_DAC.1 P0.1 U1s.6 U2s.6 U3s.6 U4s.6 U5s.6 | length 11605.8
  Top Layer w15.75: 3627.4,1783.54 3529.22,1783.54 3514.65,1798.12 3514.65,1851.2 3729.98,2066.54 3784.65,2066.54 P0.1 ; 3960,1032.6 3960,1140.78 3969.22,1150 4390,1150 4770,1530 4770,1800 4210.38,2359.62 ; C_DAC.1 4000.63,2464.09 4023.11,2441.61 P0.1 ; 5252.53,3597.47 5287.18,3562.82 5287.18,3496.18 4150.62,2359.62 ; 5736.4,860 5648.01,860 5513.15,994.86 5513.15,1142.02 4295.54,2359.62 ; 7010,2080 7010,2150.78 7029.23,2170 7240.77,2170 7250,2160.78 7250,1720 6920,1390 5360,1390 4390.38,2359.62 4295.54,2359.62 ; P0.1 4077.73,2359.62 4150.62,2359.62 ; 4150.62,2359.62 4210.38,2359.62 ; 4210.38,2359.62 4295.54,2359.62
VRX: BLE.3 P12.7 | length 559.9
  Top Layer w15.75: BLE.3 5930,2360 P12.7
VTX: BLE.4 P12.8 | length 1085.1
  Top Layer w15.75: BLE.4 5673.33,2730 5693.33,2750 6300.77,2750 6310,2740.78 6310,2461.89 P12.8
pads on no net: BLE.5 BLE.6 Ce1.0 Ce2.0 J13.1 J13.2 J13.3 J13.4 J13.5 J13.6 J13.7 J13.8 J13.9 J13.10 J18.1 J18.2 J18.3 J18.4 J18.5 J18.6 J18.7 J18.8 J18.9 J18.10 P0.2 P0.3 P0.4 P0.5 P0.6 P0.7 P0.8 P1.1 P1.2 P1.3 P1.4 P1.5 P1.6 P1.7 P1.8 P2.7 P2.8 P3.1 P3.2 P3.3 P3.4 P3.5 P3.6 P3.7 P3.8 P12.1 P12.2 P12.3 P12.4 P12.5 P12.6 P15.6 P15.7 P15.8 U1s.8 U1s.9 U1s.10 U1s.12 U1s.13 U1s.14 U2s.8 U2s.9 U2s.10 U2s.12 U2s.13 U2s.14 U3s.8 U3s.9 U3s.10 U3s.12 U3s.13 U3s.14 U4s.8 U4s.9 U4s.10 U4s.12 U4s.13 U4s.14 U5s.8 U5s.9 U5s.10 U5s.12 U5s.13 U5s.14
copper on no net: | length 807.9
  Top Layer w23.62: 3180,858.74 3189.84,868.58 3208.82,868.58 3210.24,870 3274.8,870 ; 5212.99,3951.38 5212.99,3929.13 5269.29,3872.83 5269.29,3727.17 5242.12,3700 ; 6450,827.4 6450.39,827.01 6450.39,797.48 6477.17,770.71 6650.71,770.71 6674.09,794.09 6674.09,834.72 6680,840.63 ; 6559.37,2490 6568.35,2498.98 6622.05,2498.98 6633.07,2510 6650,2510

## Keep-outs
Keep-Out Layer:
  the board outline again, w10

## Silkscreen, mask and mechanical layers (free items; w line width, h text height)
Top Overlay:
  text "3.1" at 4203.11,4100 h40
  text "3.0" at 3843.11,4090 h40
  text "3.2" at 3848.11,4000 h40
  text "3.3" at 4198.11,4000 h40
  text "3.5" at 4198.11,3900 h40
  text "3.4" at 3848.11,3890 h40
  text "1.7" at 5973.11,3825 h40
  text "3.7" at 4188.11,3805 h40
  text "3.6" at 3838.11,3770 h40
  text "1.6" at 6288.11,3750 h40
  text "1.5" at 5928.11,3640 h40
  text "1.4" at 6283.11,3640 h40
  text "Ibat" at 3828.11,3620 h40
  text "Vbat" at 4208.11,3610 h40
  text "1.3" at 5933.11,3540 h40
  text "1.2" at 6288.11,3535 h40
  text "D1" at 3898.11,3515 h40
  text "IN2" at 4203.11,3510 h40
  text "1.1" at 5943.11,3435 h40
  text "1.0" at 6288.11,3435 h40
  text "IN1" at 3858.11,3420 h40
  text "SLW" at 4203.11,3415 h40
  text "INV" at 3843.11,3315 h40
  text "EN" at 4203.11,3310 h40
  text "ENCD" at 6288.11,3240 h40
  text "ENCD" at 5883.11,3235 h40
  text "D2" at 3878.11,3210 h40
  text "D2" at 6283.11,3125 h40
  text "EN" at 5953.11,3040 h40
  text "INV" at 6283.11,3035 h40
  text "15.1" at 4198.11,3025 h40
  text "15.0" at 3813.11,3010 h40
  text "SLW" at 5923.11,2940 h40
  text "IN1" at 6288.11,2935 h40
  text "15.2" at 3813.11,2925 h40
  text "15.3" at 4198.11,2920 h40
  text "IN2" at 5933.11,2835 h40
  text "D1" at 6288.11,2830 h40
  text "15.4" at 3813.11,2820 h40
  text "15.5" at 4198.11,2820 h40
  text "ENCD" at 3803.11,2720 h40
  text "ENCD" at 4198.11,2715 h40
  text "12.0" at 5898.11,2645 h40
  text "12.1" at 6278.11,2640 h40
  text "12.2" at 5898.11,2550 h40
  text "12.3" at 6283.11,2530 h40
  text "12.4" at 5903.11,2445 h40
  text "12.5" at 6288.11,2445 h40
  text "12.6" at 5893.11,2345 h40
  text "12.7" at 6293.11,2345 h40
  text "0.1" at 4208.11,2300 h40
  text "0.0" at 3843.11,2290 h40
  text "0.2" at 3838.11,2190 h40
  text "0.3" at 4203.11,2190 h40
  text "2.7" at 5913.11,2190 h40
  text "2.6" at 6288.11,2155 h40
  text "2.5" at 5923.11,2120 h40
  text "0.5" at 4193.11,2115 h40
  text "0.4" at 3838.11,2090 h40
  text "2.4" at 6288.11,2050 h40
  text "0.6" at 3848.11,2015 h40
  text "0.7" at 4193.11,1950 h40
  text "2.3" at 5913.11,1940 h40
  text "2.2" at 6288.11,1940 h40
  text "2.1" at 5933.11,1850 h40
  text "2.0" at 6283.11,1840 h40
  text "-" at 3923.11,1680 h60 r180
  text "-" at 4268.11,1680 h60 r180
  text "-" at 6018.11,1680 h60 r180
  text "-" at 6333.11,1680 h60 r180
  text "+" at 3933.11,1530 h60 r90
  text "+" at 6028.11,1530 h60 r90
  text "+" at 4268.11,1520 h60 r90
  text "+" at 6343.11,1520 h60 r90